# Altium PCB IDC_Tester_v1.PcbDoc (part 1 of 5)
Units mm, origin at the board's own origin, x right, y up, seen from the top; angles counter-clockwise.
Board outline 140 x 140 mm, 2 copper layers (Top Layer, Bottom Layer); 594 components, 528 nets, 1855 pads, 179 vias.
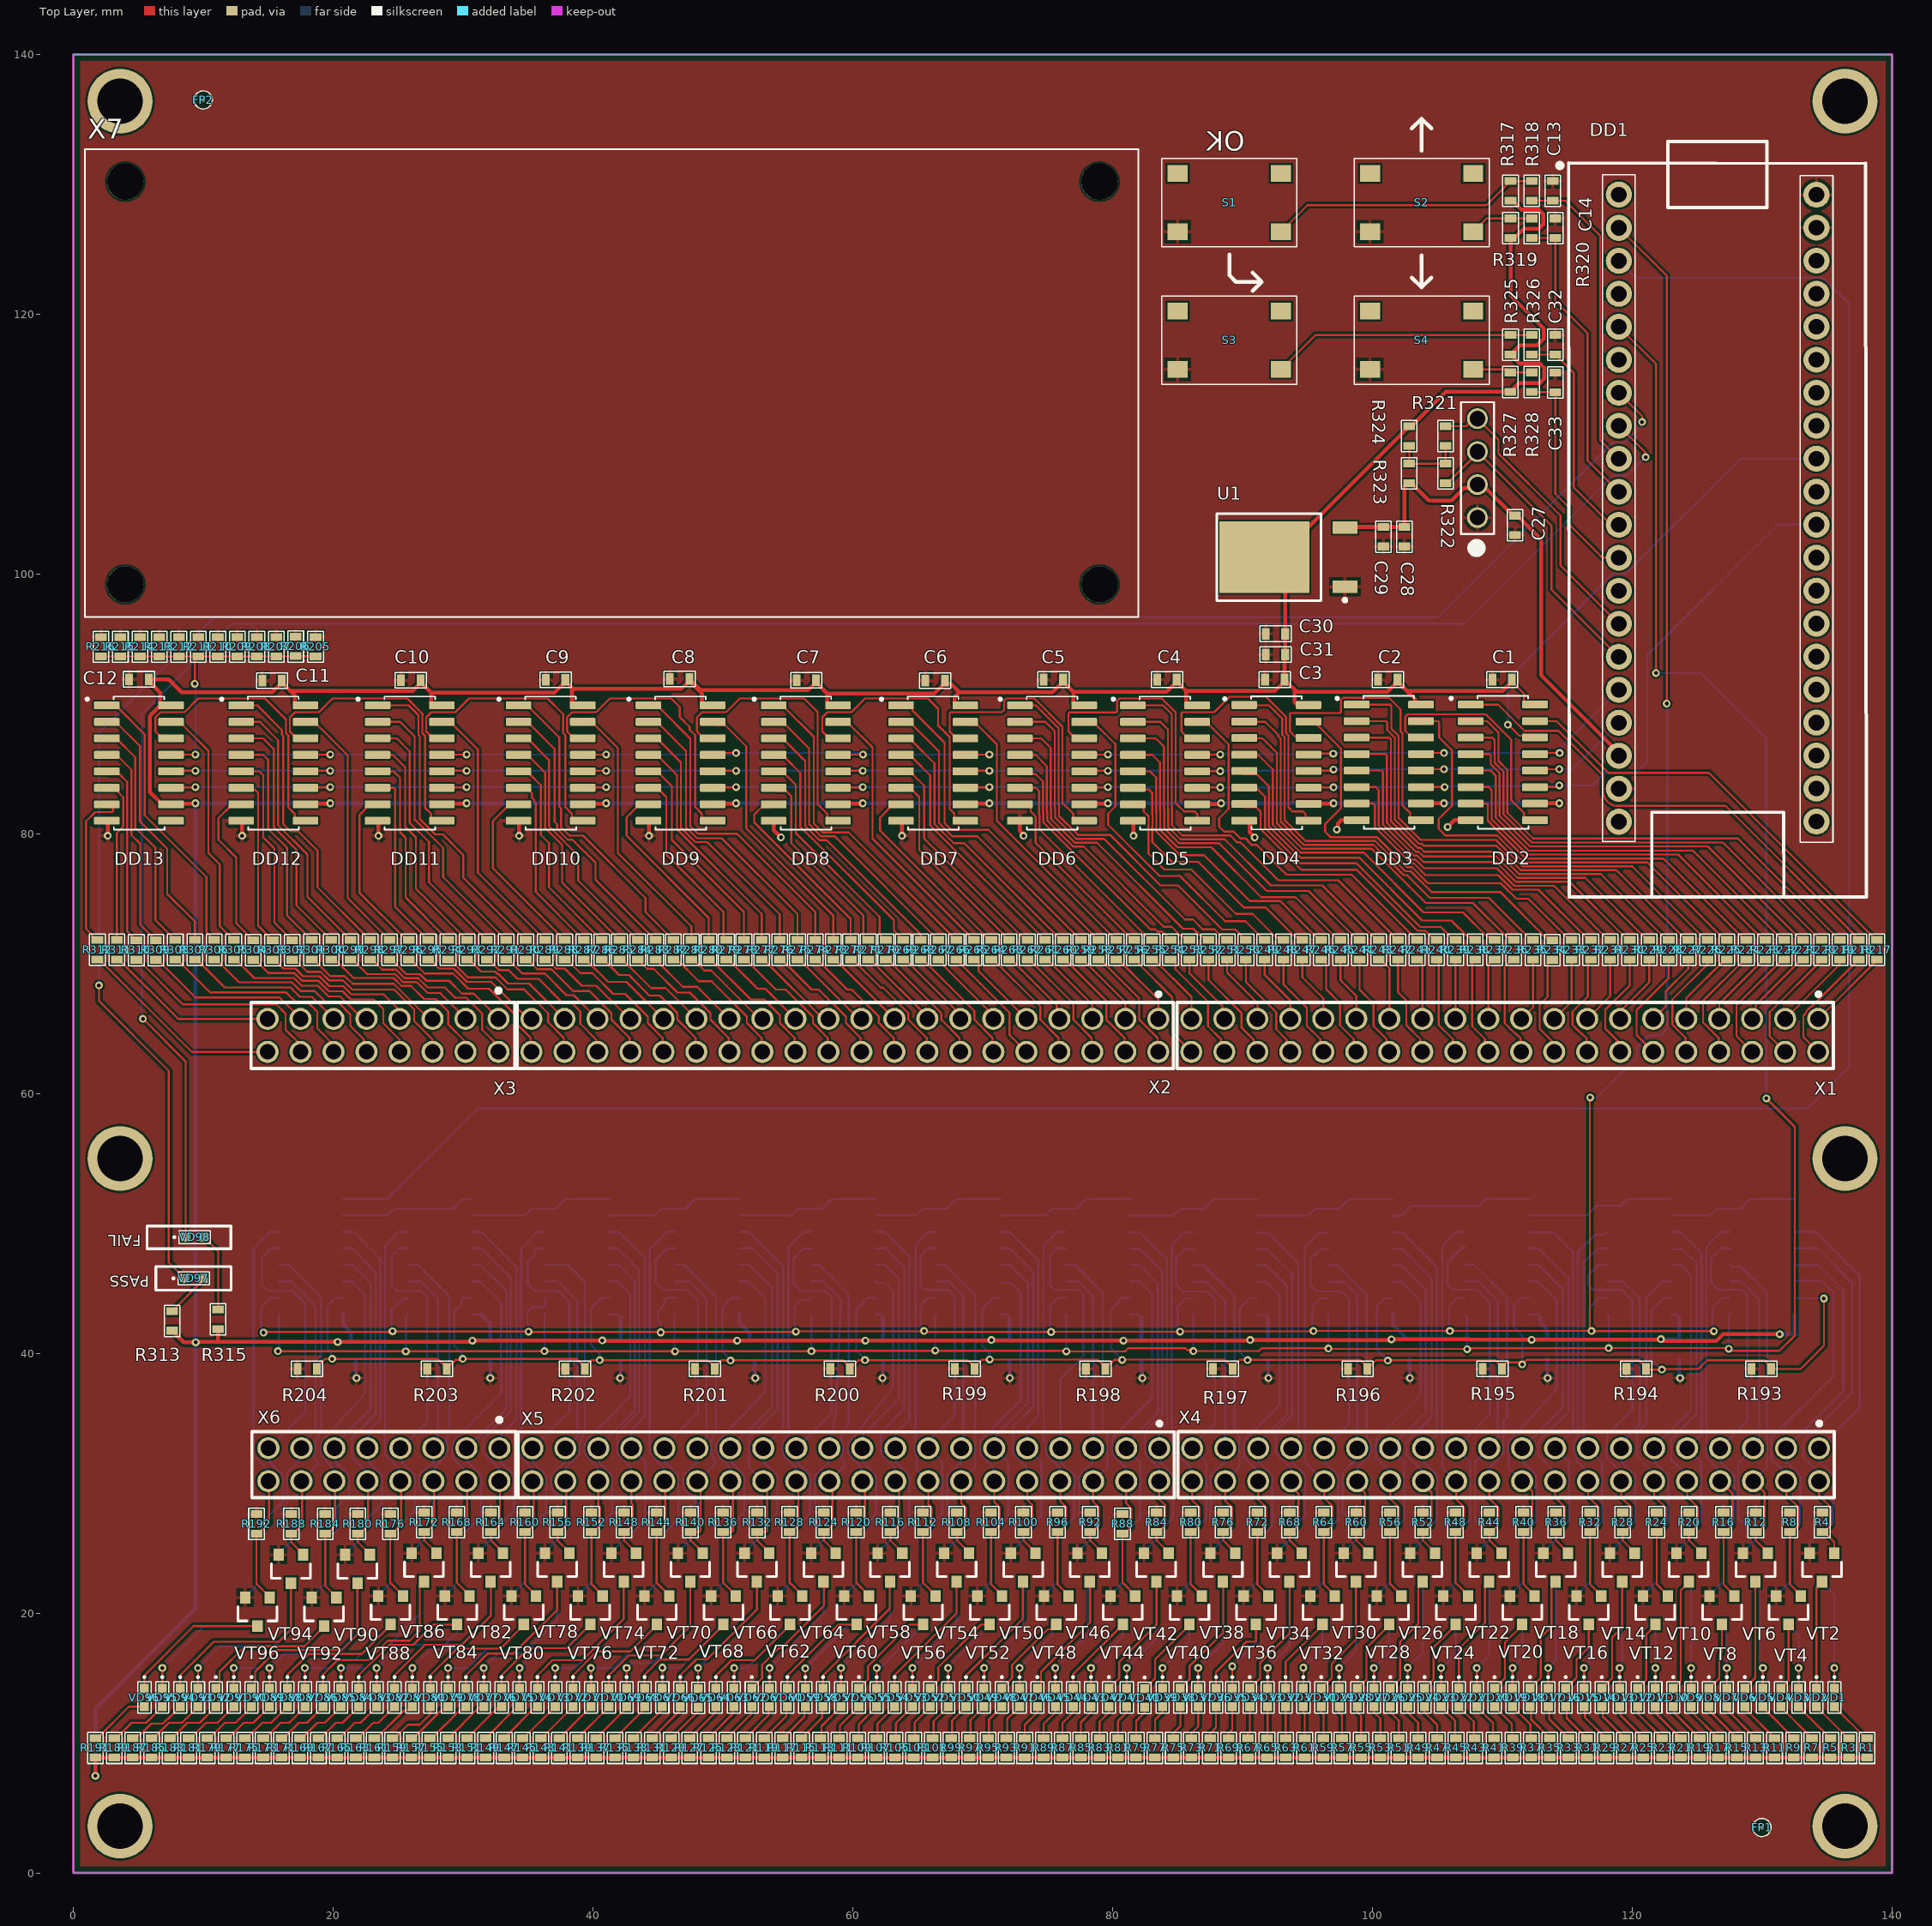
[diagram p0: Top Layer view]
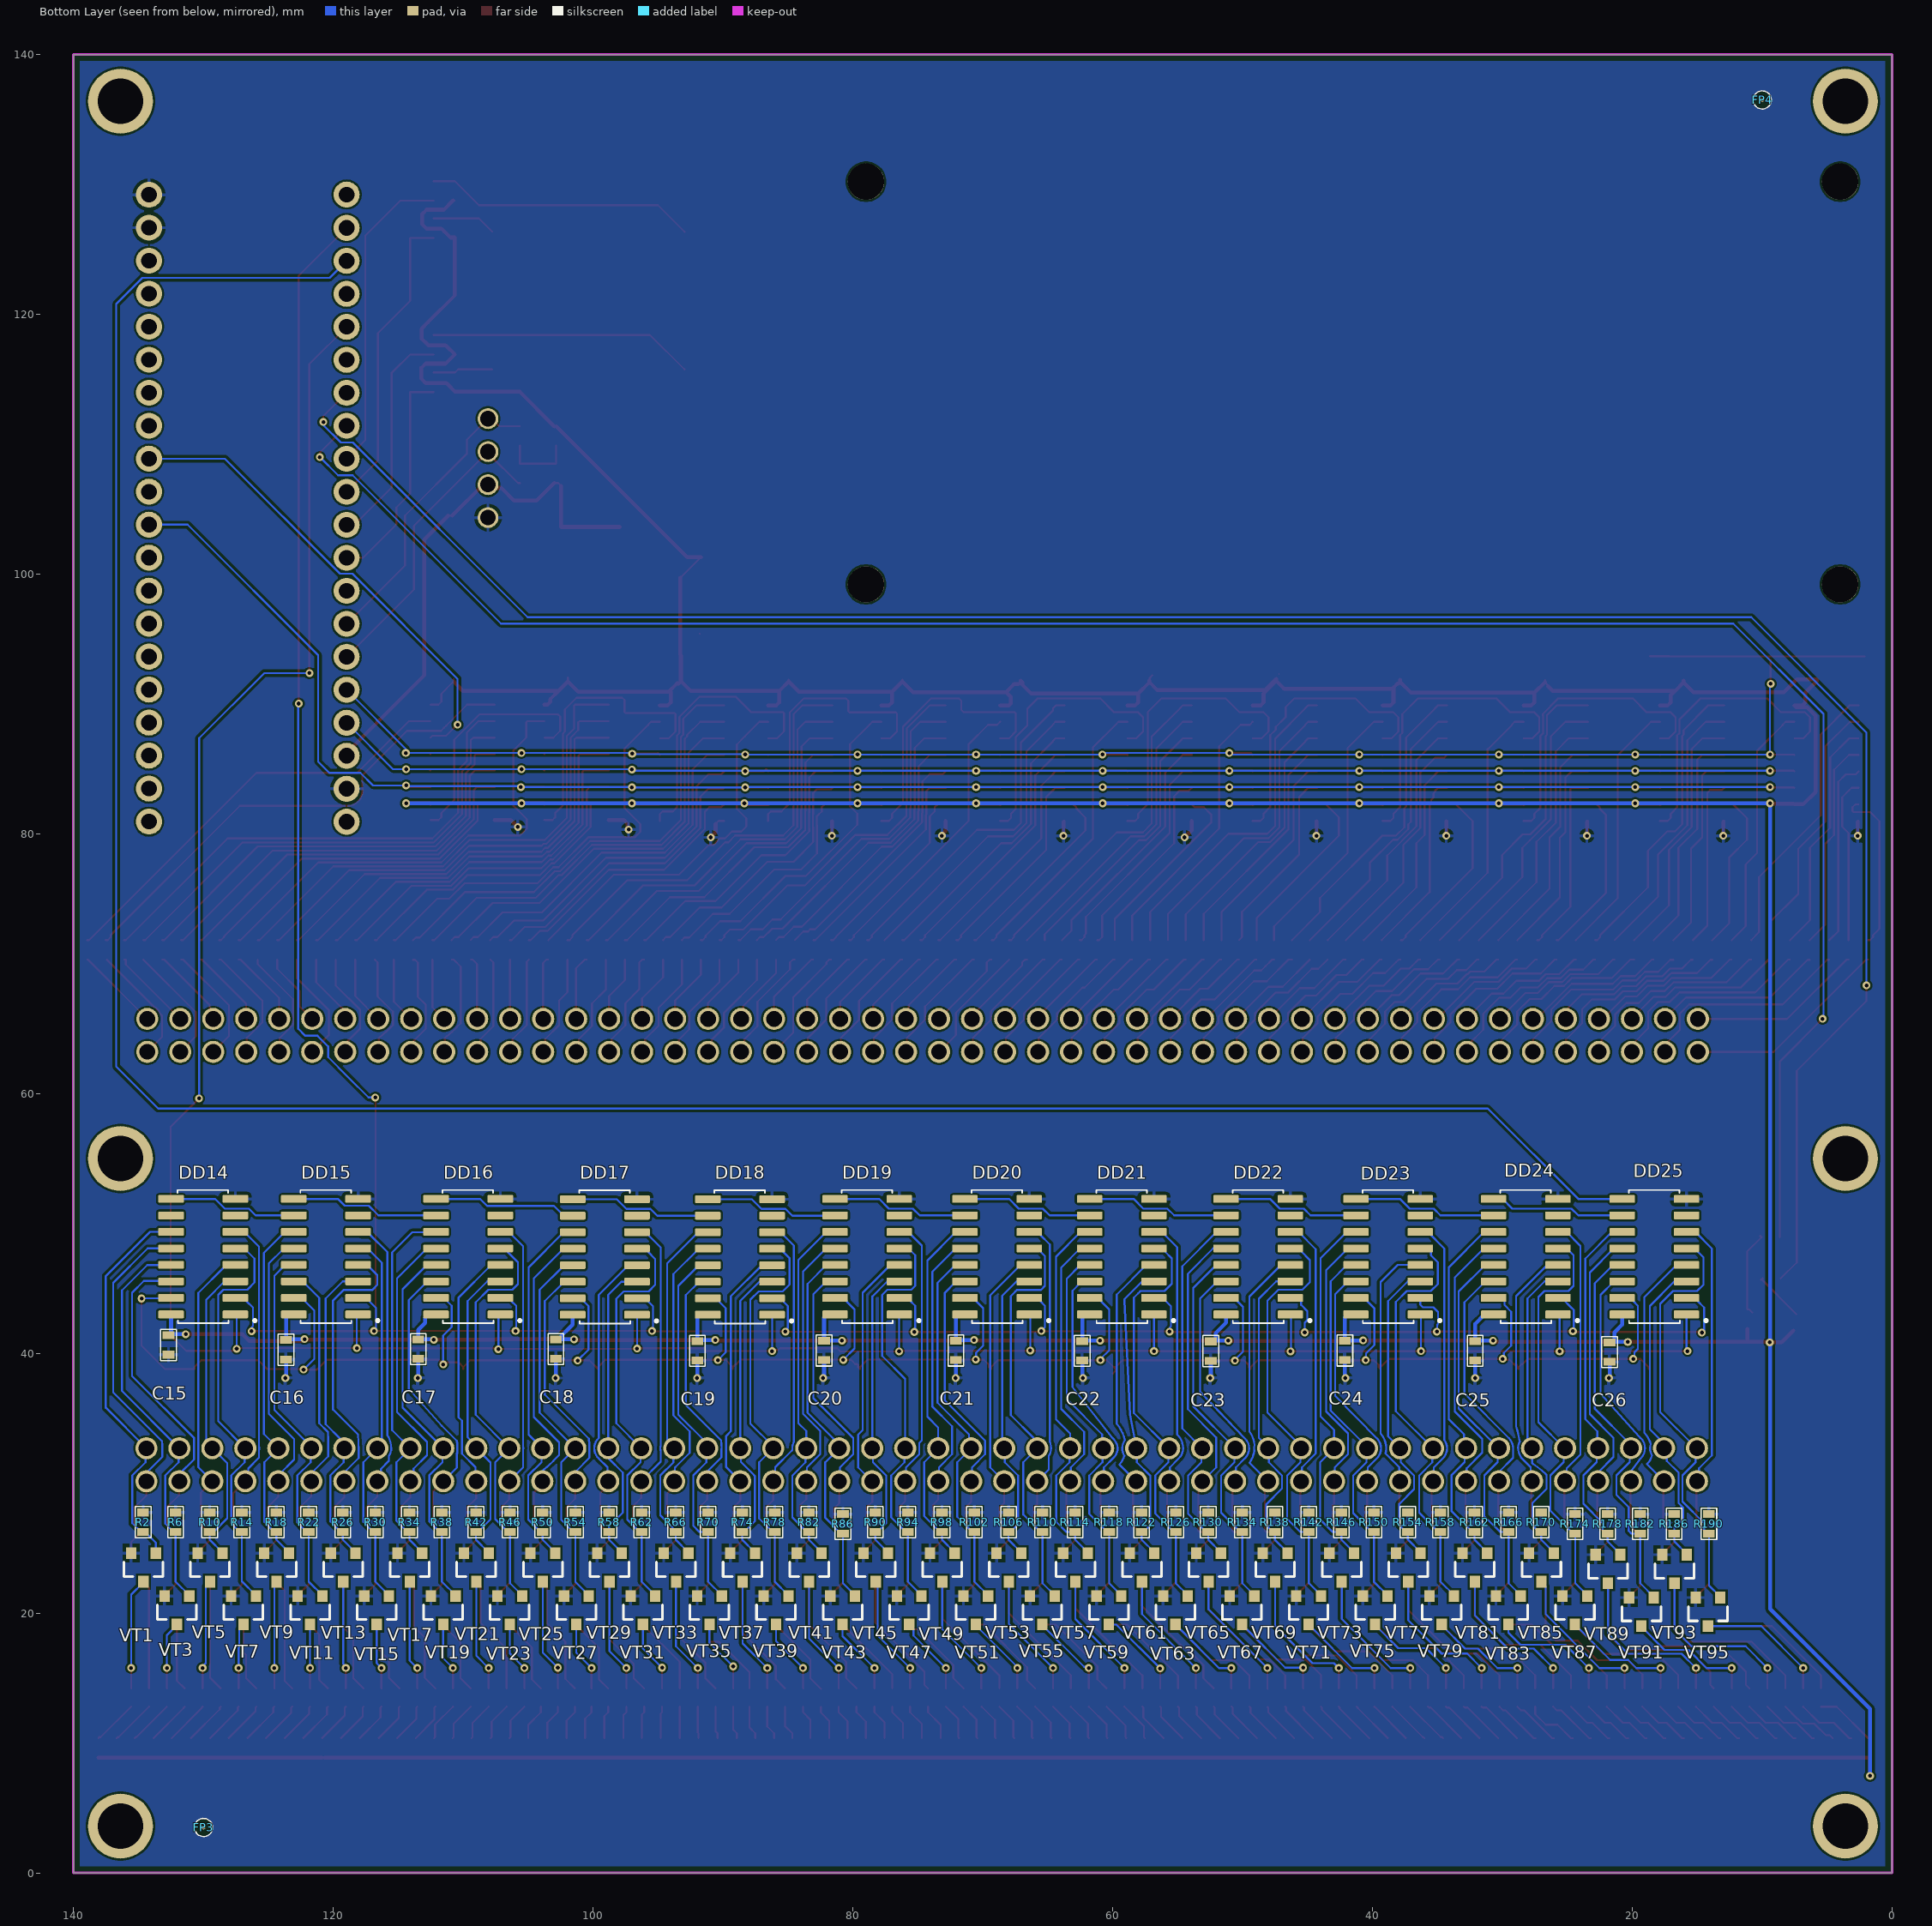
[diagram p1: Bottom Layer view, seen from below]

## Layer stack, top to bottom
Top Solder: solder mask 0.0102, Solder Resist, Dk 3.5
Top Layer: signal copper 0.0356
Dielectric 1: dielectric 0.32, FR-4, Dk 4.8
Bottom Layer: signal copper 0.0356
Bottom Solder: solder mask 0.0102, Solder Resist, Dk 3.5

## Board outline
0.025,0 140.025,0 140.025,140 0.025,140

## Design rules (kind name [scope] priority, off if disabled: settings)
BoardOutlineClearance [All] p1: gap=0.5 ignorepadtopadclearanceinfootprint=FALSE
Clearance [All] p1: gap=0.15 ignorepadtopadclearanceinfootprint=FALSE except(0.2: Arc-Arc Arc-Via Arc-Fill Arc-Poly Arc-Region Arc-Text Track-Via Track-Fill Track-Poly Track-Region Track-Text SMDPad-Text THPad-Text Via-Text Fill-Text Poly-Text Region-Text Text-Text)
ComponentClearance [All] p1: gap=0 collisioncheckmode=3 verticalgap=0.254 showdistances=FALSE
MinimumSolderMaskSliver [All] p1: minsoldermaskwidth=0.2
PolygonConnect [All] p1: connectstyle=Relief reliefconductorwidth=0.254 reliefentries=4 polygonreliefangle="90 Angle" airgapwidth=0.254
RoutingVias [All] p1: holewidth=0.3 width=0.6 viastyle="Through Hole" minholewidth=0.3 minwidth=0.6 maxholewidth=1 maxwidth=2
SilkToSilkClearance [All] p1: silktosilkclearance=0.2
SilkToSolderMaskClearance [IsPad] p1: minsilkscreentomaskgap=0 clearancetoexposedcopper=TRUE
SolderMaskExpansion [All] p1: expansion=0.102 istentingtop=FALSE
Width [All] p1: maxlimit=0.3 minlimit=0.15 preferedwidth=0.15
26 further rules are at their usual default settings.

## Classes and differential pairs
component class IDC_Tester_v1_sift_register_output: C1 C2 C3 C4 C5 C6 C7 C8 C9 C10 C11 C12 DD2 DD3 DD4 DD5 DD6 DD7 DD8 DD9 DD10 DD11 DD12 DD13 R205 R206 R207 R208 R209 R210 R211 R212 R213 R214 R215 R216 R217 R218 R219 R220 R221 R222 R223 R224 R225 R226 R227 R228 R229 R230 R231 R232 R233 R234 R235 R236 R237 R238 R239 R240 R241 R242 R243 R244 R245 R246 R247 R248 R249 R250 R251 R252 R253 R254 R255 R256 R257 R258 R259 R260 R261 R262 R263 R264 R265 R266 R267 R268 R269 R270 R271 R272 R273 R274 R275 R276 R277 R278 R279 R280 R281 R282 R283 R284 R285 R286 R287 R288 R289 R290 R291 R292 R293 R294 R295 R296 R297 R298 R299 R300 R301 R302 R303 R304 R305 R306 R307 R308 R309 R310 R311 R312
component class IDC_Tester_v1_sift_register_input: C15 C16 C17 C18 C19 C20 C21 C22 C23 C24 C25 C26 DD14 DD15 DD16 DD17 DD18 DD19 DD20 DD21 DD22 DD23 DD24 DD25 R193 R194 R195 R196 R197 R198 R199 R200 R201 R202 R203 R204
component class IDC_Tester_v1_mcu: C13 C14 C27 C28 C29 C30 C31 C32 C33 DD1 FP1 FP2 FP3 FP4 R313 R315 R317 R318 R319 R320 R321 R322 R323 R324 R325 R326 R327 R328 S1 S2 S3 S4 U1 VD97 VD98 X7
component class IDC_Tester_v1_LED: R1 R2 R3 R4 R5 R6 R7 R8 R9 R10 R11 R12 R13 R14 R15 R16 R17 R18 R19 R20 R21 R22 R23 R24 R25 R26 R27 R28 R29 R30 R31 R32 R33 R34 R35 R36 VD1 VD2 VD3 VD4 VD5 VD6 VD7 VD8 VD9 VD10 VD11 VD12 VD13 VD14 VD15 VD16 VD17 VD18 VT1 VT2 VT3 VT4 VT5 VT6 VT7 VT8 VT9 VT10 VT11 VT12 VT13 VT14 VT15 VT16 VT17 VT18
component class IDC_Tester_v1_LED_6: R181 R182 R183 R184 R185 R186 R187 R188 R189 R190 R191 R192 VD91 VD92 VD93 VD94 VD95 VD96 VT91 VT92 VT93 VT94 VT95 VT96
component class IDC_Tester_v1_LED_5: R145 R146 R147 R148 R149 R150 R151 R152 R153 R154 R155 R156 R157 R158 R159 R160 R161 R162 R163 R164 R165 R166 R167 R168 R169 R170 R171 R172 R173 R174 R175 R176 R177 R178 R179 R180 VD73 VD74 VD75 VD76 VD77 VD78 VD79 VD80 VD81 VD82 VD83 VD84 VD85 VD86 VD87 VD88 VD89 VD90 VT73 VT74 VT75 VT76 VT77 VT78 VT79 VT80 VT81 VT82 VT83 VT84 VT85 VT86 VT87 VT88 VT89 VT90
component class IDC_Tester_v1_LED_4: R109 R110 R111 R112 R113 R114 R115 R116 R117 R118 R119 R120 R121 R122 R123 R124 R125 R126 R127 R128 R129 R130 R131 R132 R133 R134 R135 R136 R137 R138 R139 R140 R141 R142 R143 R144 VD55 VD56 VD57 VD58 VD59 VD60 VD61 VD62 VD63 VD64 VD65 VD66 VD67 VD68 VD69 VD70 VD71 VD72 VT55 VT56 VT57 VT58 VT59 VT60 VT61 VT62 VT63 VT64 VT65 VT66 VT67 VT68 VT69 VT70 VT71 VT72
component class IDC_Tester_v1_LED_3: R73 R74 R75 R76 R77 R78 R79 R80 R81 R82 R83 R84 R85 R86 R87 R88 R89 R90 R91 R92 R93 R94 R95 R96 R97 R98 R99 R100 R101 R102 R103 R104 R105 R106 R107 R108 VD37 VD38 VD39 VD40 VD41 VD42 VD43 VD44 VD45 VD46 VD47 VD48 VD49 VD50 VD51 VD52 VD53 VD54 VT37 VT38 VT39 VT40 VT41 VT42 VT43 VT44 VT45 VT46 VT47 VT48 VT49 VT50 VT51 VT52 VT53 VT54
component class IDC_Tester_v1_LED_2: R37 R38 R39 R40 R41 R42 R43 R44 R45 R46 R47 R48 R49 R50 R51 R52 R53 R54 R55 R56 R57 R58 R59 R60 R61 R62 R63 R64 R65 R66 R67 R68 R69 R70 R71 R72 VD19 VD20 VD21 VD22 VD23 VD24 VD25 VD26 VD27 VD28 VD29 VD30 VD31 VD32 VD33 VD34 VD35 VD36 VT19 VT20 VT21 VT22 VT23 VT24 VT25 VT26 VT27 VT28 VT29 VT30 VT31 VT32 VT33 VT34 VT35 VT36
component class IDC_Tester_v1_connector: X1 X2 X3 X4 X5 X6

## Components (designator, comment, footprint, x,y, rotation, side; value= is the part's Value field where it differs from the comment)
C1 "1uF" "CAPACITOR 0603" 109.95,91.875 r180 top
C2 "1uF" "CAPACITOR 0603" 101.15,91.875 r180 top
C3 "1uF" "CAPACITOR 0603" 92.45,91.875 r180 top
C4 "1uF" "CAPACITOR 0603" 84.15,91.875 r180 top
C5 "1uF" "CAPACITOR 0603" 75.4,91.875 r180 top
C6 "1uF" "CAPACITOR 0603" 66.3,91.8 r180 top
C7 "1uF" "CAPACITOR 0603" 56.375,91.825 r180 top
C8 "1uF" "CAPACITOR 0603" 46.625,91.925 r180 top
C9 "1uF" "CAPACITOR 0603" 37.075,91.85 r180 top
C10 "1uF" "CAPACITOR 0603" 25.925,91.825 r180 top
C11 "1uF" "CAPACITOR 0603" 15.25,91.8 r180 top
C12 "1uF" "CAPACITOR 0603" 5,91.9 r180 top
C13 "1uF" "CAPACITOR 0603" 113.9,129.55 r90 top
C14 "1uF" "CAPACITOR 0603" 114.1,126.675 r90 top
C15 "1uF" "CAPACITOR 0603" 132.7,40.6 r270 bottom
C16 "1uF" "CAPACITOR 0603" 123.65,40.225 r270 bottom
C17 "1uF" "CAPACITOR 0603" 113.475,40.275 r270 bottom
C18 "1uF" "CAPACITOR 0603" 102.875,40.275 r270 bottom
C19 "1uF" "CAPACITOR 0603" 91.975,40.15 r270 bottom
C20 "1uF" "CAPACITOR 0603" 82.225,40.175 r270 bottom
C21 "1uF" "CAPACITOR 0603" 72.075,40.175 r270 bottom
C22 "1uF" "CAPACITOR 0603" 62.35,40.15 r270 bottom
C23 "1uF" "CAPACITOR 0603" 52.45,40.125 r270 bottom
C24 "1uF" "CAPACITOR 0603" 42.125,40.175 r270 bottom
C25 "1uF" "CAPACITOR 0603" 32.1,40.15 r270 bottom
C26 "1uF" "CAPACITOR 0603" 21.75,40.05 r270 bottom
C27 "1uF" "CAPACITOR 0603" 111,103.7 r270 top
C28 "0.1uF" "CAPACITOR 0603" 102.475,102.825 r270 top
C29 "10uF" "CAPACITOR 0603" 100.85,102.825 r270 top
C30 "0.1uF" "CAPACITOR 0603" 92.5,95.4 r180 top
C31 "10uF" "CAPACITOR 0603" 92.5,93.8 r180 top
C32 "1uF" "CAPACITOR 0603" 114.1,117.7 r90 top
C33 "1uF" "CAPACITOR 0603" 114.1,114.8 r90 top
DD1 "STM 32 blue pill" "STM32 BLUE PILL" 127.021,103.551 r180 top locked
DD2 "74HC595D,118" "SHIFT REGISTER 74HC165 OR 74HC595" 110.075,85.425 r0 top
DD3 "74HC595D,118" "SHIFT REGISTER 74HC165 OR 74HC595" 101.3,85.425 r0 top
DD4 "74HC595D,118" "SHIFT REGISTER 74HC165 OR 74HC595" 92.646,85.387 r0 top
DD5 "74HC595D,118" "SHIFT REGISTER 74HC165 OR 74HC595" 84.071,85.367 r0 top
DD6 "74HC595D,118" "SHIFT REGISTER 74HC165 OR 74HC595" 75.371,85.367 r0 top
DD7 "74HC595D,118" "SHIFT REGISTER 74HC165 OR 74HC595" 66.221,85.367 r0 top
DD8 "74HC595D,118" "SHIFT REGISTER 74HC165 OR 74HC595" 56.421,85.367 r0 top
DD9 "74HC595D,118" "SHIFT REGISTER 74HC165 OR 74HC595" 46.771,85.367 r0 top
DD10 "74HC595D,118" "SHIFT REGISTER 74HC165 OR 74HC595" 36.771,85.367 r0 top
DD11 "74HC595D,118" "SHIFT REGISTER 74HC165 OR 74HC595" 25.921,85.367 r0 top
DD12 "74HC595D,118" "SHIFT REGISTER 74HC165 OR 74HC595" 15.421,85.367 r0 top
DD13 "74HC595D,118" "SHIFT REGISTER 74HC165 OR 74HC595" 5.071,85.367 r0 top
DD14 "SN74HC165DR" "SHIFT REGISTER 74HC165 OR 74HC595" 130.046,47.523 r0 bottom
DD15 "SN74HC165DR" "SHIFT REGISTER 74HC165 OR 74HC595" 120.596,47.523 r0 bottom
DD16 "SN74HC165DR" "SHIFT REGISTER 74HC165 OR 74HC595" 109.646,47.523 r0 bottom
DD17 "SN74HC165DR" "SHIFT REGISTER 74HC165 OR 74HC595" 99.125,47.5 r0 bottom
DD18 "SN74HC165DR" "SHIFT REGISTER 74HC165 OR 74HC595" 88.725,47.5 r0 bottom
DD19 "SN74HC165DR" "SHIFT REGISTER 74HC165 OR 74HC595" 78.925,47.523 r0 bottom
DD20 "SN74HC165DR" "SHIFT REGISTER 74HC165 OR 74HC595" 68.925,47.523 r0 bottom
DD21 "SN74HC165DR" "SHIFT REGISTER 74HC165 OR 74HC595" 59.325,47.523 r0 bottom
DD22 "SN74HC165DR" "SHIFT REGISTER 74HC165 OR 74HC595" 48.825,47.523 r0 bottom
DD23 "SN74HC165DR" "SHIFT REGISTER 74HC165 OR 74HC595" 38.825,47.523 r0 bottom
DD24 "SN74HC165DR" "SHIFT REGISTER 74HC165 OR 74HC595" 28.225,47.523 r0 bottom
DD25 "SN74HC165DR" "SHIFT REGISTER 74HC165 OR 74HC595" 18.325,47.523 r0 bottom
FP1 "FIDUCIAL" "FIDICIAL POINT - R0.3" 130,3.5 r90 top
FP2 "FIDUCIAL" "FIDICIAL POINT - R0.3" 10,136.5 r90 top
FP3 "FIDUCIAL" "FIDICIAL POINT - R0.3" 130,3.5 r0 bottom
FP4 "FIDUCIAL" "FIDICIAL POINT - R0.3" 10,136.5 r90 bottom
R1 "1K" "RESISTOR 0603" 138.075,9.625 r270 top
R2 "10K" "RESISTOR 0603" 134.625,27 r90 bottom
R3 "1K" "RESISTOR 0603" 136.675,9.625 r270 top
R4 "10K" "RESISTOR 0603" 134.675,27 r90 top
R5 "1K" "RESISTOR 0603" 135.275,9.625 r270 top
R6 "10K" "RESISTOR 0603" 132.125,27 r90 bottom
R7 "1K" "RESISTOR 0603" 133.825,9.625 r270 top
R8 "10K" "RESISTOR 0603" 132.175,27 r90 top
R9 "1K" "RESISTOR 0603" 132.425,9.625 r270 top
R10 "10K" "RESISTOR 0603" 129.5,27 r90 bottom
R11 "1K" "RESISTOR 0603" 130.95,9.625 r270 top
R12 "10K" "RESISTOR 0603" 129.55,27 r90 top
R13 "1K" "RESISTOR 0603" 129.475,9.625 r270 top
R14 "10K" "RESISTOR 0603" 127.025,27 r90 bottom
R15 "1K" "RESISTOR 0603" 128.05,9.625 r270 top
R16 "10K" "RESISTOR 0603" 127.075,27 r90 top
R17 "1K" "RESISTOR 0603" 126.6,9.625 r270 top
R18 "10K" "RESISTOR 0603" 124.375,27 r90 bottom
R19 "1K" "RESISTOR 0603" 125.175,9.625 r270 top
R20 "10K" "RESISTOR 0603" 124.425,27 r90 top
R21 "1K" "RESISTOR 0603" 123.725,9.625 r270 top
R22 "10K" "RESISTOR 0603" 121.875,27 r90 bottom
R23 "1K" "RESISTOR 0603" 122.3,9.625 r270 top
R24 "10K" "RESISTOR 0603" 121.925,27 r90 top
R25 "1K" "RESISTOR 0603" 120.85,9.625 r270 top
R26 "10K" "RESISTOR 0603" 119.25,27 r90 bottom
R27 "1K" "RESISTOR 0603" 119.4,9.625 r270 top
R28 "10K" "RESISTOR 0603" 119.3,27 r90 top
R29 "1K" "RESISTOR 0603" 117.95,9.625 r270 top
R30 "10K" "RESISTOR 0603" 116.75,27 r90 bottom
R31 "1K" "RESISTOR 0603" 116.5,9.625 r270 top
R32 "10K" "RESISTOR 0603" 116.8,27 r90 top
R33 "1K" "RESISTOR 0603" 115.075,9.625 r270 top
R34 "10K" "RESISTOR 0603" 114.125,27 r90 bottom
R35 "1K" "RESISTOR 0603" 113.65,9.625 r270 top
R36 "10K" "RESISTOR 0603" 114.175,27 r90 top
R37 "1K" "RESISTOR 0603" 112.225,9.625 r270 top
R38 "10K" "RESISTOR 0603" 111.625,27 r90 bottom
R39 "1K" "RESISTOR 0603" 110.8,9.625 r270 top
R40 "10K" "RESISTOR 0603" 111.675,27 r90 top
R41 "1K" "RESISTOR 0603" 109.35,9.625 r270 top
R42 "10K" "RESISTOR 0603" 109,27 r90 bottom
R43 "1K" "RESISTOR 0603" 107.875,9.625 r270 top
R44 "10K" "RESISTOR 0603" 109.05,27 r90 top
R45 "1K" "RESISTOR 0603" 106.425,9.625 r270 top
R46 "10K" "RESISTOR 0603" 106.375,27 r90 bottom
R47 "1K" "RESISTOR 0603" 104.975,9.625 r270 top
R48 "10K" "RESISTOR 0603" 106.425,27 r90 top
R49 "1K" "RESISTOR 0603" 103.5,9.625 r270 top
R50 "10K" "RESISTOR 0603" 103.875,27 r90 bottom
R51 "1K" "RESISTOR 0603" 102.025,9.625 r270 top
R52 "10K" "RESISTOR 0603" 103.925,27 r90 top
R53 "1K" "RESISTOR 0603" 100.6,9.625 r270 top
R54 "10K" "RESISTOR 0603" 101.35,27 r90 bottom
R55 "1K" "RESISTOR 0603" 99.125,9.625 r270 top
R56 "10K" "RESISTOR 0603" 101.4,27 r90 top
R57 "1K" "RESISTOR 0603" 97.65,9.625 r270 top
R58 "10K" "RESISTOR 0603" 98.75,27 r90 bottom
R59 "1K" "RESISTOR 0603" 96.225,9.625 r270 top
R60 "10K" "RESISTOR 0603" 98.8,27 r90 top
R61 "1K" "RESISTOR 0603" 94.775,9.625 r270 top
R62 "10K" "RESISTOR 0603" 96.25,27 r90 bottom
R63 "1K" "RESISTOR 0603" 93.3,9.625 r270 top
R64 "10K" "RESISTOR 0603" 96.3,27 r90 top
R65 "1K" "RESISTOR 0603" 91.875,9.625 r270 top
R66 "10K" "RESISTOR 0603" 93.625,27 r90 bottom
R67 "1K" "RESISTOR 0603" 90.4,9.625 r270 top
R68 "10K" "RESISTOR 0603" 93.675,27 r90 top
R69 "1K" "RESISTOR 0603" 88.925,9.625 r270 top
R70 "10K" "RESISTOR 0603" 91.125,27 r90 bottom
R71 "1K" "RESISTOR 0603" 87.5,9.625 r270 top
R72 "10K" "RESISTOR 0603" 91.175,27 r90 top
R73 "1K" "RESISTOR 0603" 86.05,9.625 r270 top
R74 "10K" "RESISTOR 0603" 88.5,27 r90 bottom
R75 "1K" "RESISTOR 0603" 84.65,9.625 r270 top
R76 "10K" "RESISTOR 0603" 88.55,27 r90 top
R77 "1K" "RESISTOR 0603" 83.25,9.625 r270 top
R78 "10K" "RESISTOR 0603" 86,27 r90 bottom
R79 "1K" "RESISTOR 0603" 81.8,9.625 r270 top
R80 "10K" "RESISTOR 0603" 86.05,27 r90 top
R81 "1K" "RESISTOR 0603" 80.4,9.625 r270 top
R82 "10K" "RESISTOR 0603" 83.375,27 r90 bottom
R83 "1K" "RESISTOR 0603" 78.975,9.625 r270 top
R84 "10K" "RESISTOR 0603" 83.425,27 r90 top
R85 "1K" "RESISTOR 0603" 77.55,9.625 r270 top
R86 "10K" "RESISTOR 0603" 80.75,26.875 r90 bottom
R87 "1K" "RESISTOR 0603" 76.125,9.625 r270 top
R88 "10K" "RESISTOR 0603" 80.8,26.875 r90 top
R89 "1K" "RESISTOR 0603" 74.675,9.625 r270 top
R90 "10K" "RESISTOR 0603" 78.25,27 r90 bottom
R91 "1K" "RESISTOR 0603" 73.225,9.625 r270 top
R92 "10K" "RESISTOR 0603" 78.3,27 r90 top
R93 "1K" "RESISTOR 0603" 71.8,9.625 r270 top
R94 "10K" "RESISTOR 0603" 75.75,27 r90 bottom
R95 "1K" "RESISTOR 0603" 70.4,9.625 r270 top
R96 "10K" "RESISTOR 0603" 75.8,27 r90 top
R97 "1K" "RESISTOR 0603" 68.975,9.625 r270 top
R98 "10K" "RESISTOR 0603" 73.125,27 r90 bottom
R99 "1K" "RESISTOR 0603" 67.55,9.625 r270 top
R100 "10K" "RESISTOR 0603" 73.175,27 r90 top
R101 "1K" "RESISTOR 0603" 66.125,9.625 r270 top
R102 "10K" "RESISTOR 0603" 70.625,27 r90 bottom
R103 "1K" "RESISTOR 0603" 64.675,9.625 r270 top
R104 "10K" "RESISTOR 0603" 70.675,27 r90 top
R105 "1K" "RESISTOR 0603" 63.225,9.625 r270 top
R106 "10K" "RESISTOR 0603" 68,27 r90 bottom
R107 "1K" "RESISTOR 0603" 61.8,9.625 r270 top
R108 "10K" "RESISTOR 0603" 68.05,27 r90 top
R109 "1K" "RESISTOR 0603" 60.375,9.625 r270 top
R110 "10K" "RESISTOR 0603" 65.375,27 r90 bottom
R111 "1K" "RESISTOR 0603" 58.925,9.625 r270 top
R112 "10K" "RESISTOR 0603" 65.425,27 r90 top
R113 "1K" "RESISTOR 0603" 57.5,9.625 r270 top
R114 "10K" "RESISTOR 0603" 62.875,27 r90 bottom
R115 "1K" "RESISTOR 0603" 56.05,9.625 r270 top
R116 "10K" "RESISTOR 0603" 62.925,27 r90 top
R117 "1K" "RESISTOR 0603" 54.6,9.625 r270 top
R118 "10K" "RESISTOR 0603" 60.25,27 r90 bottom
R119 "1K" "RESISTOR 0603" 53.175,9.625 r270 top
R120 "10K" "RESISTOR 0603" 60.3,27 r90 top
R121 "1K" "RESISTOR 0603" 51.725,9.625 r270 top
R122 "10K" "RESISTOR 0603" 57.75,27 r90 bottom
R123 "1K" "RESISTOR 0603" 50.3,9.625 r270 top
R124 "10K" "RESISTOR 0603" 57.8,27 r90 top
R125 "1K" "RESISTOR 0603" 48.875,9.625 r270 top
R126 "10K" "RESISTOR 0603" 55.125,27 r90 bottom
R127 "1K" "RESISTOR 0603" 47.425,9.625 r270 top
R128 "10K" "RESISTOR 0603" 55.175,27 r90 top
R129 "1K" "RESISTOR 0603" 46,9.625 r270 top
R130 "10K" "RESISTOR 0603" 52.625,27 r90 bottom
R131 "1K" "RESISTOR 0603" 44.55,9.625 r270 top
R132 "10K" "RESISTOR 0603" 52.675,27 r90 top
R133 "1K" "RESISTOR 0603" 43.1,9.625 r270 top
R134 "10K" "RESISTOR 0603" 50,27 r90 bottom
R135 "1K" "RESISTOR 0603" 41.675,9.625 r270 top
R136 "10K" "RESISTOR 0603" 50.05,27 r90 top
R137 "1K" "RESISTOR 0603" 40.225,9.625 r270 top
R138 "10K" "RESISTOR 0603" 47.5,27 r90 bottom
R139 "1K" "RESISTOR 0603" 38.8,9.625 r270 top
R140 "10K" "RESISTOR 0603" 47.55,27 r90 top
R141 "1K" "RESISTOR 0603" 37.4,9.625 r270 top
R142 "10K" "RESISTOR 0603" 44.875,27 r90 bottom
R143 "1K" "RESISTOR 0603" 35.975,9.625 r270 top
R144 "10K" "RESISTOR 0603" 44.925,27 r90 top
R145 "1K" "RESISTOR 0603" 34.55,9.625 r270 top
R146 "10K" "RESISTOR 0603" 42.375,27 r90 bottom
R147 "1K" "RESISTOR 0603" 33.15,9.625 r270 top
R148 "10K" "RESISTOR 0603" 42.425,27 r90 top
R149 "1K" "RESISTOR 0603" 31.725,9.625 r270 top
R150 "10K" "RESISTOR 0603" 39.875,27 r90 bottom
R151 "1K" "RESISTOR 0603" 30.3,9.625 r270 top
R152 "10K" "RESISTOR 0603" 39.925,27 r90 top
R153 "1K" "RESISTOR 0603" 28.85,9.625 r270 top
R154 "10K" "RESISTOR 0603" 37.25,27 r90 bottom
R155 "1K" "RESISTOR 0603" 27.425,9.625 r270 top
R156 "10K" "RESISTOR 0603" 37.3,27 r90 top
R157 "1K" "RESISTOR 0603" 26,9.625 r270 top
R158 "10K" "RESISTOR 0603" 34.75,27 r90 bottom
R159 "1K" "RESISTOR 0603" 24.55,9.625 r270 top
R160 "10K" "RESISTOR 0603" 34.8,27 r90 top
R161 "1K" "RESISTOR 0603" 23.15,9.625 r270 top
R162 "10K" "RESISTOR 0603" 32.125,27 r90 bottom
R163 "1K" "RESISTOR 0603" 21.725,9.625 r270 top
R164 "10K" "RESISTOR 0603" 32.175,27 r90 top
R165 "1K" "RESISTOR 0603" 20.3,9.625 r270 top
R166 "10K" "RESISTOR 0603" 29.5,27 r90 bottom
R167 "1K" "RESISTOR 0603" 18.85,9.625 r270 top
R168 "10K" "RESISTOR 0603" 29.55,27 r90 top
R169 "1K" "RESISTOR 0603" 17.425,9.625 r270 top
R170 "10K" "RESISTOR 0603" 27,27 r90 bottom
R171 "1K" "RESISTOR 0603" 16,9.625 r270 top
R172 "10K" "RESISTOR 0603" 27.05,27 r90 top
R173 "1K" "RESISTOR 0603" 14.6,9.625 r270 top
R174 "10K" "RESISTOR 0603" 24.375,26.875 r90 bottom
R175 "1K" "RESISTOR 0603" 13.175,9.625 r270 top
R176 "10K" "RESISTOR 0603" 24.425,26.875 r90 top
R177 "1K" "RESISTOR 0603" 11.75,9.625 r270 top
R178 "10K" "RESISTOR 0603" 21.875,26.875 r90 bottom
R179 "1K" "RESISTOR 0603" 10.3,9.625 r270 top
R180 "10K" "RESISTOR 0603" 21.925,26.875 r90 top
R181 "1K" "RESISTOR 0603" 8.85,9.625 r270 top
R182 "10K" "RESISTOR 0603" 19.375,26.875 r90 bottom
R183 "1K" "RESISTOR 0603" 7.425,9.625 r270 top
R184 "10K" "RESISTOR 0603" 19.425,26.875 r90 top
R185 "1K" "RESISTOR 0603" 6,9.625 r270 top
R186 "10K" "RESISTOR 0603" 16.75,26.875 r90 bottom
R187 "1K" "RESISTOR 0603" 4.55,9.625 r270 top
R188 "10K" "RESISTOR 0603" 16.8,26.875 r90 top
R189 "1K" "RESISTOR 0603" 3.125,9.625 r270 top
R190 "10K" "RESISTOR 0603" 14.075,26.875 r90 bottom
R191 "1K" "RESISTOR 0603" 1.675,9.625 r270 top
R192 "10K" "RESISTOR 0603" 14.125,26.875 r90 top
R193 "10K" "RESISTOR 0603" 129.95,38.825 r180 top
R194 "10K" "RESISTOR 0603" 120.325,38.825 r180 top
R195 "10K" "RESISTOR 0603" 109.25,38.825 r180 top
R196 "10K" "RESISTOR 0603" 98.875,38.825 r180 top
R197 "10K" "RESISTOR 0603" 88.5,38.825 r180 top
R198 "10K" "RESISTOR 0603" 78.7,38.825 r180 top
R199 "10K" "RESISTOR 0603" 68.625,38.825 r180 top
R200 "10K" "RESISTOR 0603" 59.025,38.825 r180 top
R201 "10K" "RESISTOR 0603" 48.625,38.825 r180 top
R202 "10K" "RESISTOR 0603" 38.625,38.825 r180 top
R203 "10K" "RESISTOR 0603" 28,38.825 r180 top
R204 "10K" "RESISTOR 0603" 18,38.825 r180 top
R205 "10K" "RESISTOR 0603" 18.675,94.4 r90 top
R206 "10K" "RESISTOR 0603" 17.15,94.425 r90 top
R207 "10K" "RESISTOR 0603" 15.65,94.4 r90 top
R208 "10K" "RESISTOR 0603" 14.15,94.4 r90 top
R209 "10K" "RESISTOR 0603" 12.65,94.4 r90 top
R210 "10K" "RESISTOR 0603" 11.15,94.4 r90 top
R211 "10K" "RESISTOR 0603" 9.65,94.4 r90 top
R212 "10K" "RESISTOR 0603" 8.15,94.4 r90 top
R213 "10K" "RESISTOR 0603" 6.65,94.4 r90 top
R214 "10K" "RESISTOR 0603" 5.15,94.4 r90 top
R215 "10K" "RESISTOR 0603" 3.65,94.4 r90 top
R216 "10K" "RESISTOR 0603" 2.15,94.4 r90 top
R217 "100R" "RESISTOR 0603" 138.825,71.075 r270 top
R218 "100R" "RESISTOR 0603" 137.425,71.075 r270 top
R219 "100R" "RESISTOR 0603" 136,71.075 r270 top
R220 "100R" "RESISTOR 0603" 134.575,71.075 r270 top
R221 "100R" "RESISTOR 0603" 133.15,71.075 r270 top
R222 "100R" "RESISTOR 0603" 131.7,71.075 r270 top
R223 "100R" "RESISTOR 0603" 130.25,71.075 r270 top
R224 "100R" "RESISTOR 0603" 128.775,71.075 r270 top
R225 "100R" "RESISTOR 0603" 127.275,71.075 r270 top
R226 "100R" "RESISTOR 0603" 125.8,71.075 r270 top
R227 "100R" "RESISTOR 0603" 124.3,71.075 r270 top
R228 "100R" "RESISTOR 0603" 122.8,71.075 r270 top
R229 "100R" "RESISTOR 0603" 121.3,71.075 r270 top
R230 "100R" "RESISTOR 0603" 119.8,71.075 r270 top
R231 "100R" "RESISTOR 0603" 118.3,71.075 r270 top
R232 "100R" "RESISTOR 0603" 116.8,71.075 r270 top
R233 "100R" "RESISTOR 0603" 115.325,71.075 r270 top
R234 "100R" "RESISTOR 0603" 113.85,71.05 r270 top
R235 "100R" "RESISTOR 0603" 112.35,71.075 r270 top
R236 "100R" "RESISTOR 0603" 110.875,71.075 r270 top
R237 "100R" "RESISTOR 0603" 109.4,71.075 r270 top
R238 "100R" "RESISTOR 0603" 107.9,71.075 r270 top
R239 "100R" "RESISTOR 0603" 106.4,71.075 r270 top
R240 "100R" "RESISTOR 0603" 104.925,71.075 r270 top
R241 "100R" "RESISTOR 0603" 103.425,71.075 r270 top
R242 "100R" "RESISTOR 0603" 101.95,71.075 r270 top
R243 "100R" "RESISTOR 0603" 100.475,71.075 r270 top
R244 "100R" "RESISTOR 0603" 99,71.075 r270 top
R245 "100R" "RESISTOR 0603" 97.525,71.075 r270 top
R246 "100R" "RESISTOR 0603" 96.05,71.075 r270 top
R247 "100R" "RESISTOR 0603" 94.6,71.075 r270 top
R248 "100R" "RESISTOR 0603" 93.15,71.075 r270 top
R249 "100R" "RESISTOR 0603" 91.7,71.075 r270 top
R250 "100R" "RESISTOR 0603" 90.25,71.075 r270 top
R251 "100R" "RESISTOR 0603" 88.8,71.075 r270 top
R252 "100R" "RESISTOR 0603" 87.375,71.075 r270 top
R253 "100R" "RESISTOR 0603" 85.9,71.075 r270 top
R254 "100R" "RESISTOR 0603" 84.45,71.075 r270 top
R255 "100R" "RESISTOR 0603" 83.025,71.075 r270 top
R256 "100R" "RESISTOR 0603" 81.65,71.075 r270 top
R257 "100R" "RESISTOR 0603" 80.275,71.075 r270 top
R258 "100R" "RESISTOR 0603" 78.9,71.075 r270 top
R259 "100R" "RESISTOR 0603" 77.55,71.075 r270 top
R260 "100R" "RESISTOR 0603" 76.175,71.075 r270 top
R261 "100R" "RESISTOR 0603" 74.8,71.075 r270 top
R262 "100R" "RESISTOR 0603" 73.425,71.075 r270 top
R263 "100R" "RESISTOR 0603" 72.025,71.075 r270 top
R264 "100R" "RESISTOR 0603" 70.65,71.075 r270 top
R265 "100R" "RESISTOR 0603" 69.3,71.075 r270 top
R266 "100R" "RESISTOR 0603" 67.95,71.075 r270 top
R267 "100R" "RESISTOR 0603" 66.575,71.075 r270 top
R268 "100R" "RESISTOR 0603" 65.225,71.075 r270 top
R269 "100R" "RESISTOR 0603" 63.875,71.075 r270 top
R270 "100R" "RESISTOR 0603" 62.525,71.075 r270 top
R271 "100R" "RESISTOR 0603" 61.175,71.075 r270 top
R272 "100R" "RESISTOR 0603" 59.825,71.075 r270 top
R273 "100R" "RESISTOR 0603" 58.475,71.075 r270 top
R274 "100R" "RESISTOR 0603" 57.1,71.075 r270 top
R275 "100R" "RESISTOR 0603" 55.725,71.075 r270 top
R276 "100R" "RESISTOR 0603" 54.35,71.075 r270 top
R277 "100R" "RESISTOR 0603" 52.975,71.075 r270 top
R278 "100R" "RESISTOR 0603" 51.6,71.075 r270 top
R279 "100R" "RESISTOR 0603" 50.25,71.075 r270 top
R280 "100R" "RESISTOR 0603" 48.9,71.075 r270 top
R281 "100R" "RESISTOR 0603" 47.55,71.075 r270 top
R282 "100R" "RESISTOR 0603" 46.175,71.075 r270 top
R283 "100R" "RESISTOR 0603" 44.8,71.075 r270 top
R284 "100R" "RESISTOR 0603" 43.425,71.075 r270 top
R285 "100R" "RESISTOR 0603" 42.025,71.075 r270 top
R286 "100R" "RESISTOR 0603" 40.65,71.075 r270 top
R287 "100R" "RESISTOR 0603" 39.275,71.075 r270 top
R288 "100R" "RESISTOR 0603" 37.8,71.075 r270 top
R289 "100R" "RESISTOR 0603" 36.3,71.075 r270 top
R290 "100R" "RESISTOR 0603" 34.8,71.075 r270 top
R291 "100R" "RESISTOR 0603" 33.3,71.075 r270 top
R292 "100R" "RESISTOR 0603" 31.8,71.075 r270 top
R293 "100R" "RESISTOR 0603" 30.3,71.075 r270 top
R294 "100R" "RESISTOR 0603" 28.825,71.075 r270 top
R295 "100R" "RESISTOR 0603" 27.3,71.075 r270 top
R296 "100R" "RESISTOR 0603" 25.8,71.075 r270 top
R297 "100R" "RESISTOR 0603" 24.325,71.075 r270 top
R298 "100R" "RESISTOR 0603" 22.825,71.075 r270 top
R299 "100R" "RESISTOR 0603" 21.325,71.075 r270 top
R300 "100R" "RESISTOR 0603" 19.825,71.075 r270 top
R301 "100R" "RESISTOR 0603" 18.325,71.075 r270 top
R302 "100R" "RESISTOR 0603" 16.825,71.05 r270 top
R303 "100R" "RESISTOR 0603" 15.325,71.05 r270 top
R304 "100R" "RESISTOR 0603" 13.825,71.05 r270 top
R305 "100R" "RESISTOR 0603" 12.325,71.075 r270 top
R306 "100R" "RESISTOR 0603" 10.825,71.075 r270 top
R307 "100R" "RESISTOR 0603" 9.325,71.075 r270 top
R308 "100R" "RESISTOR 0603" 7.825,71.075 r270 top
R309 "100R" "RESISTOR 0603" 6.325,71.05 r270 top
R310 "100R" "RESISTOR 0603" 4.825,71.05 r270 top
R311 "100R" "RESISTOR 0603" 3.325,71.075 r270 top
R312 "100R" "RESISTOR 0603" 1.825,71.075 r270 top
R313 "1K" "RESISTOR 0603" 7.575,42.5 r270 top
R315 "1K" "RESISTOR 0603" 11.125,42.625 r270 top
R317 "1K" "RESISTOR 0603" 110.675,129.5 r90 top
R318 "10K" "RESISTOR 0603" 112.25,129.5 r270 top
R319 "1K" "RESISTOR 0603" 110.675,126.625 r90 top
R320 "10K" "RESISTOR 0603" 112.25,126.625 r270 top
R321 "10K" "RESISTOR 0603" 105.625,110.625 r270 top
R322 "10K" "RESISTOR 0603" 105.675,107.75 r90 top
R323 "10R" "RESISTOR 0603" 102.825,107.75 r270 top
R324 "10R" "RESISTOR 0603" 102.875,110.625 r90 top
R325 "1K" "RESISTOR 0603" 110.675,117.65 r90 top
R326 "10K" "RESISTOR 0603" 112.25,117.65 r270 top
R327 "1K" "RESISTOR 0603" 110.65,114.775 r90 top
R328 "10K" "RESISTOR 0603" 112.25,114.775 r270 top
S1 "Button" BUTTON 89,128.6 r180 top
S2 "Button" BUTTON 103.8,128.6 r180 top
S3 "Button" BUTTON 89,118 r180 top
S4 "Button" BUTTON 103.8,118 r180 top
U1 "LM1117" TO-252 93.55,101.3 r180 top
VD1 "LED" "LED 0603 - DUPLICATE" 135.575,13.55 r90 top
VD2 "LED" "LED 0603 - DUPLICATE" 134.2,13.55 r90 top
VD3 "LED" "LED 0603 - DUPLICATE" 132.825,13.55 r90 top
VD4 "LED" "LED 0603 - DUPLICATE" 131.45,13.55 r90 top
VD5 "LED" "LED 0603 - DUPLICATE" 130.075,13.55 r90 top
VD6 "LED" "LED 0603 - DUPLICATE" 128.675,13.55 r90 top
VD7 "LED" "LED 0603 - DUPLICATE" 127.3,13.55 r90 top
VD8 "LED" "LED 0603 - DUPLICATE" 125.925,13.55 r90 top
VD9 "LED" "LED 0603 - DUPLICATE" 124.55,13.55 r90 top
VD10 "LED" "LED 0603 - DUPLICATE" 123.175,13.55 r90 top
VD11 "LED" "LED 0603 - DUPLICATE" 121.8,13.55 r90 top
VD12 "LED" "LED 0603 - DUPLICATE" 120.425,13.55 r90 top
VD13 "LED" "LED 0603 - DUPLICATE" 119.05,13.55 r90 top
VD14 "LED" "LED 0603 - DUPLICATE" 117.675,13.55 r90 top
VD15 "LED" "LED 0603 - DUPLICATE" 116.3,13.55 r90 top
VD16 "LED" "LED 0603 - DUPLICATE" 114.9,13.55 r90 top
VD17 "LED" "LED 0603 - DUPLICATE" 113.55,13.55 r90 top
VD18 "LED" "LED 0603 - DUPLICATE" 112.15,13.55 r90 top
VD19 "LED" "LED 0603 - DUPLICATE" 110.8,13.55 r90 top
VD20 "LED" "LED 0603 - DUPLICATE" 109.425,13.55 r90 top
VD21 "LED" "LED 0603 - DUPLICATE" 108.05,13.55 r90 top
VD22 "LED" "LED 0603 - DUPLICATE" 106.675,13.55 r90 top
VD23 "LED" "LED 0603 - DUPLICATE" 105.3,13.55 r90 top
VD24 "LED" "LED 0603 - DUPLICATE" 104.025,13.55 r90 top
VD25 "LED" "LED 0603 - DUPLICATE" 102.725,13.55 r90 top
VD26 "LED" "LED 0603 - DUPLICATE" 101.4,13.55 r90 top
VD27 "LED" "LED 0603 - DUPLICATE" 100.125,13.55 r90 top
VD28 "LED" "LED 0603 - DUPLICATE" 98.85,13.55 r90 top
VD29 "LED" "LED 0603 - DUPLICATE" 97.45,13.55 r90 top
VD30 "LED" "LED 0603 - DUPLICATE" 96.075,13.55 r90 top
VD31 "LED" "LED 0603 - DUPLICATE" 94.7,13.55 r90 top
VD32 "LED" "LED 0603 - DUPLICATE" 93.325,13.55 r90 top
VD33 "LED" "LED 0603 - DUPLICATE" 91.95,13.55 r90 top
VD34 "LED" "LED 0603 - DUPLICATE" 90.575,13.55 r90 top
VD35 "LED" "LED 0603 - DUPLICATE" 89.225,13.55 r90 top
VD36 "LED" "LED 0603 - DUPLICATE" 87.975,13.55 r90 top
VD37 "LED" "LED 0603 - DUPLICATE" 86.6,13.55 r90 top
VD38 "LED" "LED 0603 - DUPLICATE" 85.225,13.55 r90 top
VD39 "LED" "LED 0603 - DUPLICATE" 83.85,13.55 r90 top
VD40 "LED" "LED 0603 - DUPLICATE" 82.475,13.525 r90 top
VD41 "LED" "LED 0603 - DUPLICATE" 81.1,13.55 r90 top
VD42 "LED" "LED 0603 - DUPLICATE" 79.725,13.55 r90 top
VD43 "LED" "LED 0603 - DUPLICATE" 78.35,13.55 r90 top
VD44 "LED" "LED 0603 - DUPLICATE" 76.975,13.55 r90 top
VD45 "LED" "LED 0603 - DUPLICATE" 75.6,13.55 r90 top
VD46 "LED" "LED 0603 - DUPLICATE" 74.225,13.55 r90 top
VD47 "LED" "LED 0603 - DUPLICATE" 72.85,13.55 r90 top
VD48 "LED" "LED 0603 - DUPLICATE" 71.475,13.55 r90 top
VD49 "LED" "LED 0603 - DUPLICATE" 70.1,13.55 r90 top
VD50 "LED" "LED 0603 - DUPLICATE" 68.725,13.55 r90 top
VD51 "LED" "LED 0603 - DUPLICATE" 67.35,13.55 r90 top
VD52 "LED" "LED 0603 - DUPLICATE" 65.975,13.55 r90 top
VD53 "LED" "LED 0603 - DUPLICATE" 64.6,13.55 r90 top
VD54 "LED" "LED 0603 - DUPLICATE" 63.225,13.55 r90 top
VD55 "LED" "LED 0603 - DUPLICATE" 61.85,13.55 r90 top
VD56 "LED" "LED 0603 - DUPLICATE" 60.475,13.55 r90 top
VD57 "LED" "LED 0603 - DUPLICATE" 59.1,13.55 r90 top
VD58 "LED" "LED 0603 - DUPLICATE" 57.725,13.55 r90 top
VD59 "LED" "LED 0603 - DUPLICATE" 56.35,13.55 r90 top
VD60 "LED" "LED 0603 - DUPLICATE" 54.975,13.55 r90 top
VD61 "LED" "LED 0603 - DUPLICATE" 53.6,13.55 r90 top
VD62 "LED" "LED 0603 - DUPLICATE" 52.225,13.55 r90 top
VD63 "LED" "LED 0603 - DUPLICATE" 50.85,13.55 r90 top
VD64 "LED" "LED 0603 - DUPLICATE" 49.475,13.55 r90 top
VD65 "LED" "LED 0603 - DUPLICATE" 48.1,13.525 r90 top
VD66 "LED" "LED 0603 - DUPLICATE" 46.725,13.55 r90 top
VD67 "LED" "LED 0603 - DUPLICATE" 45.35,13.55 r90 top
VD68 "LED" "LED 0603 - DUPLICATE" 43.975,13.55 r90 top
VD69 "LED" "LED 0603 - DUPLICATE" 42.6,13.55 r90 top
VD70 "LED" "LED 0603 - DUPLICATE" 41.225,13.55 r90 top
VD71 "LED" "LED 0603 - DUPLICATE" 39.85,13.55 r90 top
VD72 "LED" "LED 0603 - DUPLICATE" 38.475,13.55 r90 top
VD73 "LED" "LED 0603 - DUPLICATE" 37.1,13.55 r90 top
VD74 "LED" "LED 0603 - DUPLICATE" 35.725,13.55 r90 top
VD75 "LED" "LED 0603 - DUPLICATE" 34.35,13.55 r90 top
VD76 "LED" "LED 0603 - DUPLICATE" 32.975,13.55 r90 top
VD77 "LED" "LED 0603 - DUPLICATE" 31.6,13.55 r90 top
VD78 "LED" "LED 0603 - DUPLICATE" 30.225,13.55 r90 top
VD79 "LED" "LED 0603 - DUPLICATE" 28.85,13.55 r90 top
VD80 "LED" "LED 0603 - DUPLICATE" 27.475,13.55 r90 top
VD81 "LED" "LED 0603 - DUPLICATE" 26.1,13.55 r90 top
VD82 "LED" "LED 0603 - DUPLICATE" 24.725,13.55 r90 top
VD83 "LED" "LED 0603 - DUPLICATE" 23.35,13.55 r90 top
VD84 "LED" "LED 0603 - DUPLICATE" 21.975,13.55 r90 top
VD85 "LED" "LED 0603 - DUPLICATE" 20.6,13.55 r90 top
VD86 "LED" "LED 0603 - DUPLICATE" 19.225,13.55 r90 top
VD87 "LED" "LED 0603 - DUPLICATE" 17.85,13.55 r90 top
VD88 "LED" "LED 0603 - DUPLICATE" 16.475,13.55 r90 top
VD89 "LED" "LED 0603 - DUPLICATE" 15.1,13.55 r90 top
VD90 "LED" "LED 0603 - DUPLICATE" 13.725,13.55 r90 top
VD91 "LED" "LED 0603 - DUPLICATE" 12.35,13.55 r90 top
VD92 "LED" "LED 0603 - DUPLICATE" 10.975,13.55 r90 top
VD93 "LED" "LED 0603 - DUPLICATE" 9.6,13.55 r90 top
VD94 "LED" "LED 0603 - DUPLICATE" 8.225,13.55 r90 top
VD95 "LED" "LED 0603 - DUPLICATE" 6.85,13.55 r90 top
VD96 "LED" "LED 0603 - DUPLICATE" 5.475,13.55 r90 top
VD97 "LED (green)" "LED 0603 GREEN" 9.225,45.775 r180 top
VD98 "LED (red)" "LED 0603 RED" 9.3,48.95 r180 top
VT1 "BSS138" SOT-23-3 134.625,23.525 r270 bottom
VT2 "BSS138" SOT-23-3 134.625,23.525 r270 top
VT3 "BSS138" SOT-23-3 132.05,20.225 r270 bottom
VT4 "BSS138" SOT-23-3 132.05,20.225 r270 top
VT5 "BSS138" SOT-23-3 129.5,23.525 r270 bottom
VT6 "BSS138" SOT-23-3 129.5,23.525 r270 top
VT7 "BSS138" SOT-23-3 126.925,20.225 r270 bottom
VT8 "BSS138" SOT-23-3 126.925,20.225 r270 top
VT9 "BSS138" SOT-23-3 124.375,23.525 r270 bottom
VT10 "BSS138" SOT-23-3 124.375,23.525 r270 top
VT11 "BSS138" SOT-23-3 121.8,20.225 r270 bottom
VT12 "BSS138" SOT-23-3 121.8,20.225 r270 top
VT13 "BSS138" SOT-23-3 119.25,23.525 r270 bottom
VT14 "BSS138" SOT-23-3 119.25,23.525 r270 top
VT15 "BSS138" SOT-23-3 116.675,20.225 r270 bottom
VT16 "BSS138" SOT-23-3 116.675,20.225 r270 top
VT17 "BSS138" SOT-23-3 114.125,23.525 r270 bottom
VT18 "BSS138" SOT-23-3 114.125,23.525 r270 top
VT19 "BSS138" SOT-23-3 111.55,20.225 r270 bottom
VT20 "BSS138" SOT-23-3 111.55,20.225 r270 top
VT21 "BSS138" SOT-23-3 109,23.525 r270 bottom
VT22 "BSS138" SOT-23-3 109,23.525 r270 top
VT23 "BSS138" SOT-23-3 106.425,20.225 r270 bottom
VT24 "BSS138" SOT-23-3 106.425,20.225 r270 top
VT25 "BSS138" SOT-23-3 103.875,23.525 r270 bottom
VT26 "BSS138" SOT-23-3 103.875,23.525 r270 top
VT27 "BSS138" SOT-23-3 101.3,20.225 r270 bottom
VT28 "BSS138" SOT-23-3 101.3,20.225 r270 top
VT29 "BSS138" SOT-23-3 98.75,23.525 r270 bottom
VT30 "BSS138" SOT-23-3 98.75,23.525 r270 top
VT31 "BSS138" SOT-23-3 96.175,20.225 r270 bottom
VT32 "BSS138" SOT-23-3 96.175,20.225 r270 top
VT33 "BSS138" SOT-23-3 93.625,23.525 r270 bottom
VT34 "BSS138" SOT-23-3 93.625,23.525 r270 top
VT35 "BSS138" SOT-23-3 91.05,20.225 r270 bottom
VT36 "BSS138" SOT-23-3 91.05,20.225 r270 top
VT37 "BSS138" SOT-23-3 88.5,23.525 r270 bottom
VT38 "BSS138" SOT-23-3 88.5,23.525 r270 top
VT39 "BSS138" SOT-23-3 85.925,20.225 r270 bottom
VT40 "BSS138" SOT-23-3 85.925,20.225 r270 top
VT41 "BSS138" SOT-23-3 83.375,23.525 r270 bottom
VT42 "BSS138" SOT-23-3 83.375,23.525 r270 top
VT43 "BSS138" SOT-23-3 80.8,20.225 r270 bottom
VT44 "BSS138" SOT-23-3 80.8,20.225 r270 top
VT45 "BSS138" SOT-23-3 78.25,23.525 r270 bottom
VT46 "BSS138" SOT-23-3 78.25,23.525 r270 top
VT47 "BSS138" SOT-23-3 75.675,20.225 r270 bottom
VT48 "BSS138" SOT-23-3 75.675,20.225 r270 top
VT49 "BSS138" SOT-23-3 73.125,23.525 r270 bottom
VT50 "BSS138" SOT-23-3 73.125,23.525 r270 top
VT51 "BSS138" SOT-23-3 70.55,20.225 r270 bottom
VT52 "BSS138" SOT-23-3 70.55,20.225 r270 top
VT53 "BSS138" SOT-23-3 68,23.525 r270 bottom
VT54 "BSS138" SOT-23-3 68,23.525 r270 top
VT55 "BSS138" SOT-23-3 65.425,20.225 r270 bottom
VT56 "BSS138" SOT-23-3 65.425,20.225 r270 top
VT57 "BSS138" SOT-23-3 62.875,23.525 r270 bottom
VT58 "BSS138" SOT-23-3 62.875,23.525 r270 top
VT59 "BSS138" SOT-23-3 60.3,20.225 r270 bottom
VT60 "BSS138" SOT-23-3 60.3,20.225 r270 top
VT61 "BSS138" SOT-23-3 57.75,23.525 r270 bottom
VT62 "BSS138" SOT-23-3 57.75,23.525 r270 top
VT63 "BSS138" SOT-23-3 55.175,20.225 r270 bottom
VT64 "BSS138" SOT-23-3 55.175,20.225 r270 top
VT65 "BSS138" SOT-23-3 52.625,23.525 r270 bottom
VT66 "BSS138" SOT-23-3 52.625,23.525 r270 top
VT67 "BSS138" SOT-23-3 50.05,20.225 r270 bottom
VT68 "BSS138" SOT-23-3 50.05,20.225 r270 top
VT69 "BSS138" SOT-23-3 47.5,23.525 r270 bottom
VT70 "BSS138" SOT-23-3 47.5,23.525 r270 top
VT71 "BSS138" SOT-23-3 44.925,20.225 r270 bottom
VT72 "BSS138" SOT-23-3 44.925,20.225 r270 top
VT73 "BSS138" SOT-23-3 42.375,23.525 r270 bottom
VT74 "BSS138" SOT-23-3 42.375,23.525 r270 top
VT75 "BSS138" SOT-23-3 39.8,20.225 r270 bottom
VT76 "BSS138" SOT-23-3 39.8,20.225 r270 top
VT77 "BSS138" SOT-23-3 37.25,23.525 r270 bottom
VT78 "BSS138" SOT-23-3 37.25,23.525 r270 top
VT79 "BSS138" SOT-23-3 34.675,20.225 r270 bottom
VT80 "BSS138" SOT-23-3 34.675,20.225 r270 top
VT81 "BSS138" SOT-23-3 32.125,23.525 r270 bottom
VT82 "BSS138" SOT-23-3 32.125,23.525 r270 top
VT83 "BSS138" SOT-23-3 29.55,20.225 r270 bottom
VT84 "BSS138" SOT-23-3 29.55,20.225 r270 top
VT85 "BSS138" SOT-23-3 27,23.525 r270 bottom
VT86 "BSS138" SOT-23-3 27,23.525 r270 top
VT87 "BSS138" SOT-23-3 24.425,20.225 r270 bottom
VT88 "BSS138" SOT-23-3 24.425,20.225 r270 top
VT89 "BSS138" SOT-23-3 21.875,23.4 r270 bottom
VT90 "BSS138" SOT-23-3 21.875,23.4 r270 top
VT91 "BSS138" SOT-23-3 19.3,20.1 r270 bottom
VT92 "BSS138" SOT-23-3 19.3,20.1 r270 top
VT93 "BSS138" SOT-23-3 16.75,23.4 r270 bottom
VT94 "BSS138" SOT-23-3 16.75,23.4 r270 top
VT95 "BSS138" SOT-23-3 14.175,20.1 r270 bottom
VT96 "BSS138" SOT-23-3 14.175,20.1 r270 top
X1 "PLD-40" PLD-40 111.303,64.28 r270 top
X2 "PLD-40" PLD-40 60.502,64.28 r270 top
X3 "PLD-16" PLD-16 34.102,64.48 r270 top
X4 "PLD-40 out" PLD-40 111.371,31.225 r270 top
X5 "PLD-40 out" PLD-40 60.57,31.22 r270 top
X6 "PLD-16 out" PLD-16 34.17,31.43 r270 top
X7 "LCD1602" LCD1602 41.602,114.343 r180 top locked

## Footprints (in the part's own frame and the unit in brackets; to place one, negate y for a bottom-side part, rotate by r counter-clockwise, add the part's x,y. Pads: shape width x height; smd on the part's side, far side on the other; paste and mask are expansions set on the pad)
BUTTON [mm]
  rect 1.549x1.295 smd: 1(-3.975,2.25) 2(3.975,2.25) 3(-3.975,-2.25) 4(3.975,-2.25)
  silkscreen extent -5.2,-3.4 5.2,3.4, body extent -4.5,-3 4.5,3, height 5
"CAPACITOR 0603" [mm]
  rect 0.6x0.9 smd: 1(-0.8,0) 2(0.7,0)
  silkscreen extent -1.25,-0.6 1.15,0.6, body extent -0.9,-0.45 0.8,0.46, height 0.91
"FIDICIAL POINT - R0.3" [mm]
  round 0.3 smd mask+0.5: 1(0,0)
  Top Layer pour cut-out: -0.65,0.019 -0.605,-0.233 -0.466,-0.449 -0.255,-0.595 -0.005,-0.65 -0.005,-0.65 0.245,-0.601 0.457,-0.461 0.599,-0.249 0.65,0 0.65,0 0.606,0.245 0.472,0.454 0.268,0.597 0.025,0.65 0.025,0.65 -0.227,0.609 -0.443,0.474 -0.592,0.267 -0.65,0.019
  silkscreen extent -0.7,-0.7 0.7,0.7
LCD1602 [mm]
  round 1.6 hole 1.2: 1(-66.5,10) 2(-66.5,7.46) 3(-66.5,4.92) 4(-66.5,2.38)
  round 2.8 hole 2.8 unplated: ""(-37.398,-15.857) ""(-37.398,15.143) ""(37.602,-15.857) ""(37.602,15.143)
  silkscreen extent -67.77,-18.36 40.7,17.64, body extent -67.77,-18.37 40.49,17.64, height 19.8
"LED 0603 - DUPLICATE" [mm]
  rect 0.7x0.7 smd: A(-0.75,0) K(0.65,0)
  silkscreen extent -1.25,-0.5 1.57,0.5, body extent -0.85,-0.4 0.75,0.4, height 0.29
"LED 0603 GREEN" [mm]
  rect 0.7x0.7 smd: A(-0.75,0) K(0.65,0)
  silkscreen extent -1.25,-0.5 1.57,0.5, body extent -0.85,-0.4 0.75,0.4, height 0.29
"LED 0603 RED" [mm]
  rect 0.7x0.7 smd: A(-0.75,0) K(0.65,0)
  silkscreen extent -1.25,-0.5 1.57,0.5, body extent -0.85,-0.4 0.75,0.4, height 0.2
PLD-16 [mm]
  round 1.7 hole 1.2: 1(-1.27,-1.37) 2(1.27,-1.37) 3(-1.27,-3.91) 4(1.27,-3.91) 5(-1.27,-6.45) 6(1.27,-6.45) 7(-1.27,-8.99) 8(1.27,-8.99) 9(-1.27,-11.53) 10(1.27,-11.53) 11(-1.27,-14.07) 12(1.27,-14.07) 13(-1.27,-16.61) 14(1.27,-16.61) 15(-1.27,-19.15) 16(1.27,-19.15)
  silkscreen extent -3.6,-20.43 2.54,-0.1, body extent -2.47,-20.44 2.53,-0.12, height 8.61
PLD-40 [mm]
  round 1.7 hole 1.2: 1(-1.47,23.03) 2(1.07,23.03) 3(-1.47,20.49) 4(1.07,20.49) 5(-1.47,17.95) 6(1.07,17.95) 7(-1.47,15.41) 8(1.07,15.41) 9(-1.47,12.87) 10(1.07,12.87) 11(-1.47,10.33) 12(1.07,10.33) 13(-1.47,7.79) 14(1.07,7.79) 15(-1.47,5.25) 16(1.07,5.25) 17(-1.47,2.71) 18(1.07,2.71) 19(-1.47,0.17) 20(1.07,0.17) 21(-1.47,-2.37) 22(1.07,-2.37) 23(-1.47,-4.91) 24(1.07,-4.91) 25(-1.47,-7.45) 26(1.07,-7.45) 27(-1.47,-9.99) 28(1.07,-9.99) 29(-1.47,-12.53) 30(1.07,-12.53) 31(-1.47,-15.07) 32(1.07,-15.07) 33(-1.47,-17.61) 34(1.07,-17.61) 35(-1.47,-20.15) 36(1.07,-20.15) 37(-1.47,-22.69) 38(1.07,-22.69) 39(-1.47,-25.23) 40(1.07,-25.23)
  silkscreen extent -3.5,-26.32 2.34,24.2, body extent -2.74,-26.46 2.34,24.34, height 8.55
"RESISTOR 0603" [mm]
  rect 0.6x0.9 smd: 1(-0.75,0.025) 2(0.75,0.025)
  silkscreen extent -1.2,-0.58 1.2,0.63, body extent -0.8,-0.38 0.8,0.43, height 0.46
"SHIFT REGISTER 74HC165 OR 74HC595" [mm]
  rrect25% 1.97x0.6 smd: 1(-2.496,4.523) 2(-2.496,3.253) 3(-2.496,1.983) 4(-2.496,0.713) 5(-2.496,-0.557) 6(-2.496,-1.827) 7(-2.496,-3.097) 8(-2.496,-4.367) 9(2.454,-4.367) 10(2.454,-3.097) 11(2.454,-1.827) 12(2.454,-0.557) 13(2.454,0.713) 14(2.454,1.983) 15(2.454,3.253) 16(2.454,4.523)
  silkscreen extent -4.1,-5.05 1.95,5.2, body extent -3.03,-4.87 2.99,5.03, height 1.75
SOT-23-3 [mm]
  rect 0.9x0.8 smd: 1(-1.1,0.95) 2(-1.1,-0.95) 3(1.1,0)
  silkscreen extent -0.4,-1.5 0.7,1.5, body extent -1.4,-1.45 1.4,1.45, height 1.3
"STM32 BLUE PILL" [mm]
  round 2 hole 1.2: 1(8.035,-25.663) 2(8.035,-23.098) 3(8.035,-20.558) 4(8.035,-18.018) 5(8.035,-15.478) 6(8.035,-12.938) 7(8.035,-10.398) 8(8.035,-7.858) 9(8.035,-5.318) 10(8.035,-2.778) 11(8.035,-0.238) 12(8.035,2.302) 13(8.035,4.842) 14(8.035,7.382) 15(8.035,9.922) 16(8.035,12.462) 17(8.035,15.002) 18(8.035,17.542) 19(8.035,20.082) 20(8.035,22.622) 21(-7.179,22.611) 22(-7.179,20.071) 23(-7.179,17.531) 24(-7.179,14.991) 25(-7.179,12.451) 26(-7.179,9.911) 27(-7.179,7.371) 28(-7.179,4.831) 29(-7.179,2.291) 30(-7.179,-0.249) 31(-7.179,-2.789) 32(-7.179,-5.329) 33(-7.179,-7.869) 34(-7.179,-10.409) 35(-7.179,-12.949) 36(-7.179,-15.489) 37(-7.179,-18.029) 38(-7.179,-20.569) 39(-7.179,-23.109) 40(-7.179,-25.649)
  silkscreen extent -11.02,-29.75 12.68,28.43, body extent -10.98,-29 11.88,28.56, height 20.77
TO-252 [mm]
  rect 1.9x0.95 smd: 1(-4.35,2.28) 3(-4.35,-2.28)
  rect 6.9x5.5 smd: 4(1.85,0)
  silkscreen extent -4.47,-3.35 5.5,3.43, body extent -5.1,-3.35 5.25,3.35, height 2.41

## Part data
C1 C2 C3 C4 C5 C6 C7 C8 C9 C10 C11 C12 C13 C14 C15 C16 C17 C18 C19 C20 C21 C22 C23 C24 C25 C26 C27 C32 C33: library part Capacitor, Part Number="SMD CAP CER 1UF 25V X5R 0603 (CC0603KRX5R8BB105)", Added by=viskov2055@gmail.com, Created at=16/02/2024, Mount=MOUNT, Mount_Type=SMD, Pkg=0603, Solder_Amount=2
C28 C30: library part C0603_2, "Capacitor SMD 0603", Part Number="CAP CER 0603 0.1uF 16V 10%", Added_by=ridel_av@teslatec.ru, Mount=MOUNT, MountType=SMD, Pkg=0603, Solder_Amount=2
C29 C31: library part C0603_3, "Capacitor SMD 0603", Part Number="CAP CER 0603 10uF 16V 10%", Added_by=ridel_av@teslatec.ru, Mount=MOUNT, MountType=SMD, Pkg=0603, Solder_Amount=2
DD1: Part Number="STM32F103C8T6 (blue pill)", Added by=viskov2055@gmail.com, Created at=13/02/2024, Mount=MOUNT, Mount_Type=THM, Pkg="PBS-40 (STM32 blue pill)", Solder_Amount=40
DD2 DD3 DD4 DD5 DD6 DD7 DD8 DD9 DD10 DD11 DD12 DD13: "74HC Series 6 V 3-State Surface Mount Shift Register - SOIC-16", Manufacturer=Nexperia, Supplier Part Number 1=1707956, Added by=viskov2055@gmail.com, Category="Shift Registers", ComponentLink1Description=http://www.farnell.com/datasheets/2038613.pdf?src-supplier=Farnell, ComponentLink1URL=http://www.farnell.com/datasheets/2038613.pdf?src-supplier=Farnell, ComponentLink2Description=https://assets.nexperia.com/documents/data-sheet/74HC_HCT595.pdf?src-supplier=Digikey, ComponentLink2URL=https://assets.nexperia.com/documents/data-sheet/74HC_HCT595.pdf?src-supplier=Digikey, ComponentLink3Description=https://datasheet.octopart.com/74HC595D%2C118-Nexperia-datasheet-62292421.pdf?src-supplier=Newark, ComponentLink3URL=https://datasheet.octopart.com/74HC595D%2C118-Nexperia-datasheet-62292421.pdf?src-supplier=Newark, ComponentLink4Description=http://www.farnell.com/datasheets/2038613.pdf?src-supplier=Newark, ComponentLink4URL=http://www.farnell.com/datasheets/2038613.pdf?src-supplier=Newark, ComponentLink5Description=http://www.farnell.com/datasheets/2038613.pdf?src-supplier=Element14, ComponentLink5URL=http://www.farnell.com/datasheets/2038613.pdf?src-supplier=Element14, ComponentLink6Description=https://datasheet.octopart.com/74HC595D%2C118-Nexperia-datasheet-11979826.pdf?src-supplier=Element14, ComponentLink6URL=https://datasheet.octopart.com/74HC595D%2C118-Nexperia-datasheet-11979826.pdf?src-supplier=Element14, Created at=13/02/2024, Manufacturer Part Number=74HC595D,118, Mount=MOUNT, Mount_Type=SMD, Part Number=74HC595D,118, Pkg=SOIC-16, Pricing 1="2500=32,44, 5000=31,895 (RUB)", RoHS=Yes, Solder_Amount=16, Stock 1=7500, Supplier 1=Rs
DD14 DD15 DD16 DD17 DD18 DD19 DD20 DD21 DD22 DD23 DD24 DD25: "IC 8-BIT SHIFT REGISTER 16-SOIC", Manufacturer="Texas Instruments", Supplier Part Number 1=296-8250-1-ND, Added by=viskov2055@gmail.com, Category="Shift Registers", ComponentLink1Description=https://datasheet.ciiva.com/15093/getdatasheetpartid-251161-15093655.pdf?src-supplier=Verical, ComponentLink1URL=https://datasheet.ciiva.com/15093/getdatasheetpartid-251161-15093655.pdf?src-supplier=Verical, ComponentLink2Description=https://datasheet.ciiva.com/34301/915180-34301754.pdf?src-supplier=Jameco, ComponentLink2URL=https://datasheet.ciiva.com/34301/915180-34301754.pdf?src-supplier=Jameco, ComponentLink3Description=https://datasheet.ciiva.com/41456/001016679-da-01-en-ic-8bit-shft-reg-sn74hc165dr-soic-16-tid-41456900.pdf?src-supplier=Conrad, ComponentLink3URL=https://datasheet.ciiva.com/41456/001016679-da-01-en-ic-8bit-shft-reg-sn74hc165dr-soic-16-tid-41456900.pdf?src-supplier=Conrad, ComponentLink4Description=https://datasheet.ciiva.com/46397/1831348-46397223.pdf?src-supplier=Element14, ComponentLink4URL=https://datasheet.ciiva.com/46397/1831348-46397223.pdf?src-supplier=Element14, ComponentLink5Description=https://datasheet.ciiva.com/14295/sn54hc165-14295050.pdf?src-supplier=Avnet, ComponentLink5URL=https://datasheet.ciiva.com/14295/sn54hc165-14295050.pdf?src-supplier=Avnet, ComponentLink6Description=https://datasheet.ciiva.com/14295/sn54hc165-14295052.pdf?src-supplier=Avnet, ComponentLink6URL=https://datasheet.ciiva.com/14295/sn54hc165-14295052.pdf?src-supplier=Avnet, ComponentLink7Description=https://datasheet.ciiva.com/1886/sn74hc165-1886212.pdf?src-supplier=Digikey, ComponentLink7URL=https://datasheet.ciiva.com/1886/sn74hc165-1886212.pdf?src-supplier=Digikey, ComponentLink8Description=https://datasheet.ciiva.com/1886/sn74hc165-1886213.pdf?src-supplier=Digikey, ComponentLink8URL=https://datasheet.ciiva.com/1886/sn74hc165-1886213.pdf?src-supplier=Digikey, ComponentLink9Description=https://datasheet.ciiva.com/1886/sn74hc165-1886214.pdf?src-supplier=Digikey, ComponentLink9URL=https://datasheet.ciiva.com/1886/sn74hc165-1886214.pdf?src-supplier=Digikey, Created at=13/02/2024, Manufacturer Part Number=SN74HC165DR, Mount=MOUNT, Mount_Type=SMD, Part Number=SN74HC165DR, Pkg=16-SOIC, Pricing 1="1=0,47, 10=0,357, 25=0,322, 100=0,2226, 250=0,18744, 500=0,1523, 1000=0,11716 (USD)", RoHS=Yes, Solder_Amount=16, Stock 1=2933, Supplier 1=Digikey
FP1 FP2 FP3 FP4: library part FIDUCIAL_R0.3, Adder_by=ridel_av@teslatec.ru, Created_at=22/03/2020, Mount=-, MountType=-, Pkg=-, Solder_Amount=-
R1 R3 R5 R7 R9 R11 R13 R15 R17 R19 R21 R23 R25 R27 R29 R31 R33 R35 R37 R39 R41 R43 R45 R47 R49 R51 R53 R55 R57 R59 R61 R63 R65 R67 R69 R71 R73 R75 R77 R79 R81 R83 R85 R87 R89 R91 R93 R95 R97 R99 R101 R103 R105 R107 R109 R111 R113 R115 R117 R119 R121 R123 R125 R127 R129 R131 R133 R135 R137 R139 R141 R143 R145 R147 R149 R151 R153 R155 R157 R159 R161 R163 R165 R167 R169 R171 R173 R175 R177 R179 R181 R183 R185 R187 R189 R191 R313 R315 R317 R319 R325 R327: library part "Resistor 1K", Part Number="SMD RES 1K OHM 1%±100ppm/°C 0603 (RMCF0603FT1K00)", Added by=viskov2055@gmail.com, Created at=13/02/2024, Mount=MOUNT, Mount_Type=SMD, Pkg=0603, Solder_Amount=2
R2 R4 R6 R8 R10 R12 R14 R16 R18 R20 R22 R24 R26 R28 R30 R32 R34 R36 R38 R40 R42 R44 R46 R48 R50 R52 R54 R56 R58 R60 R62 R64 R66 R68 R70 R72 R74 R76 R78 R80 R82 R84 R86 R88 R90 R92 R94 R96 R98 R100 R102 R104 R106 R108 R110 R112 R114 R116 R118 R120 R122 R124 R126 R128 R130 R132 R134 R136 R138 R140 R142 R144 R146 R148 R150 R152 R154 R156 R158 R160 R162 R164 R166 R168 R170 R172 R174 R176 R178 R180 R182 R184 R186 R188 R190 R192 R193 R194 R195 R196 R197 R198 R199 R200 R201 R202 R203 R204 R205 R206 R207 R208 R209 R210 R211 R212 R213 R214 R215 R216 R318 R320 R321 R322 R326 R328: library part "Resistor 10K", Part Number="SMD RES 10K OHM 1%±100ppm/°C 0603 (RMCF0603FT10K0)", Added by=viskov2055@gmail.com, Created at=15/02/2024, Mount=MOUNT, Mount_Type=SMD, Pkg=0603, Solder_Amount=2
R217 R218 R219 R220 R221 R222 R223 R224 R225 R226 R227 R228 R229 R230 R231 R232 R233 R234 R235 R236 R237 R238 R239 R240 R241 R242 R243 R244 R245 R246 R247 R248 R249 R250 R251 R252 R253 R254 R255 R256 R257 R258 R259 R260 R261 R262 R263 R264 R265 R266 R267 R268 R269 R270 R271 R272 R273 R274 R275 R276 R277 R278 R279 R280 R281 R282 R283 R284 R285 R286 R287 R288 R289 R290 R291 R292 R293 R294 R295 R296 R297 R298 R299 R300 R301 R302 R303 R304 R305 R306 R307 R308 R309 R310 R311 R312: library part "Resistor 100R", Part Number="SMD RES 100 OHM 1% ±100ppm/°C 0603 (RMCF0603FT100R)", Added by=viskov2055@gmail.com, Created at=19/02/2024, Mount=MOUNT, Mount_Type=SMD, Pkg=0603, Solder_Amount=2
R323 R324: library part "Resistor 10R", Part Number="SMD RES 10 OHM 1% ±100ppm/°C 0603 (RMCF0603FT10R)", Added by=viskov2055@gmail.com, Created at=19/02/2024, Mount=DNP, Mount_Type=SMD, Pkg=0603, Solder_Amount=2
S1 S2 S3 S4: Part Number=PTS645SM43SMTR92LFS, Added by=viskov2055@gmail.com, Created at=19/02/2024, Mount=MOUNT, Mpunt_Type=SMD, Pkg=Button, Solder_Amount=4
U1: library part LM1117DT-3.3/NOPB, "800mA Low-Dropout Linear Regulator, 3-pin TO-252, Pb-Free", Added_by=ridel_av@teslatec.ru, Mount=MOUNT, MountType=SMD, Part Number=LM1117DT-3.3/NOPB, Pkg=TD03B_N, Solder_Amount=3
VD1 VD2 VD3 VD4 VD5 VD6 VD7 VD8 VD9 VD10 VD11 VD12 VD13 VD14 VD15 VD16 VD17 VD18 VD19 VD20 VD21 VD22 VD23 VD24 VD25 VD26 VD27 VD28 VD29 VD30 VD31 VD32 VD33 VD34 VD35 VD36 VD37 VD38 VD39 VD40 VD41 VD42 VD43 VD44 VD45 VD46 VD47 VD48 VD49 VD50 VD51 VD52 VD53 VD54 VD55 VD56 VD57 VD58 VD59 VD60 VD61 VD62 VD63 VD64 VD65 VD66 VD67 VD68 VD69 VD70 VD71 VD72 VD73 VD74 VD75 VD76 VD77 VD78 VD79 VD80 VD81 VD82 VD83 VD84 VD85 VD86 VD87 VD88 VD89 VD90 VD91 VD92 VD93 VD94 VD95 VD96: "LED Uni-Color Green 515nm 2-Pin SMD T/R", Case Code (Imperial)=0603, Case Code (Metric)=1608, Color=Green, Forward Voltage=3.3V, Manufacturer=Kingbright, Manufacturer Part Number=APG1608ZGCK, Supplier Part Number 1=754-2113-1-ND, Test Current=20mA, Added by=viskov2055@gmail.com, Case/Package=0603, Category=LEDs, ComponentLink1Description=https://datasheet.octopart.com/APG1608ZGCK-Kingbright-datasheet-153682089.pdf?src-supplier=Future+Electronics, ComponentLink1URL=https://datasheet.octopart.com/APG1608ZGCK-Kingbright-datasheet-153682089.pdf?src-supplier=Future+Electronics, ComponentLink2Description=http://www.kingbrightusa.com/images/catalog/SPEC/APG1608ZGCK.pdf?src-supplier=Digikey, ComponentLink2URL=http://www.kingbrightusa.com/images/catalog/SPEC/APG1608ZGCK.pdf?src-supplier=Digikey, ComponentLink3Description=https://datasheet.octopart.com/APG1608ZGCK-Kingbright-datasheet-137408059.pdf?src-supplier=Sager+Electronics, ComponentLink3URL=https://datasheet.octopart.com/APG1608ZGCK-Kingbright-datasheet-137408059.pdf?src-supplier=Sager+Electronics, Created at=13/02/2024, Dominant Wavelength=525nm, Height=0.28mm, Length=1.6mm, Lens Size=0.8mm, Lens Style=Flat, Lens Transparency=Clear, Luminous Intensity=400mcd, Mount=MOUNT, MountType=SMD, Packaging="Tape and Reel", Part Number=APG1608ZGCK, Pkg=0603, Pricing 1="1=0,6, 10=0,368, 100=0,2114, 1000=0,16544, 2000=0,15165 (USD)", RoHS=Yes, RoHS Compliant=Yes, Solder_Amount=2, Stock 1=44996, Supplier 1=Digikey, Viewing Angle=130°, Width=0.8mm